# Altium PCB Zulu_a7_no_pmod.PcbDoc (part 3 of 5)
Units mm, origin at the board's own origin, x right, y up, seen from the top; angles counter-clockwise.
Board outline 60.96 x 25.4 mm, 6 copper layers (Top Layer, L2-GND, L3-SIG, L4-SIG, L5-VCC3V3, Bottom Layer), stack 1.65 mm thick; 169 components, 161 nets, 811 pads, 1742 vias.
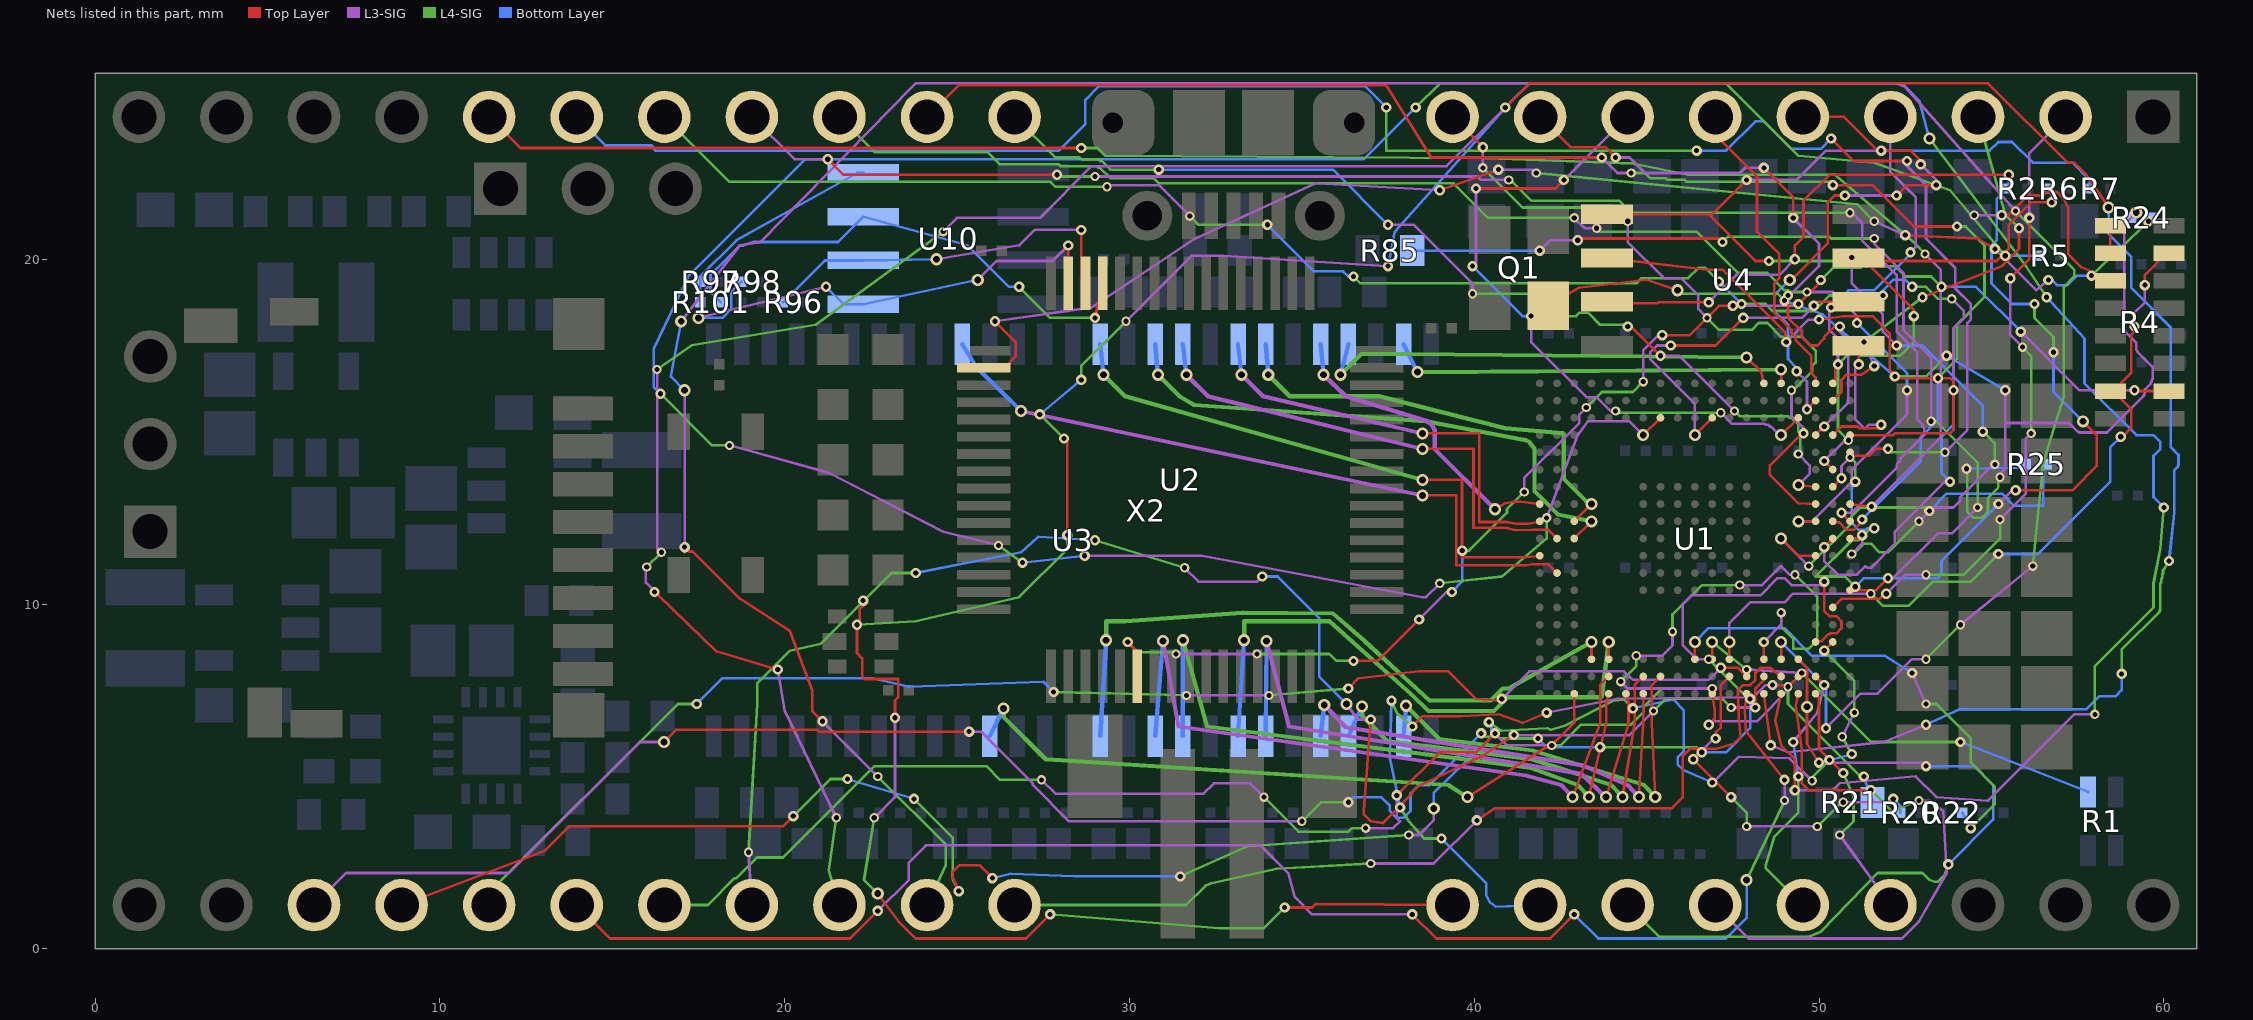
[diagram p6: the nets of this part, all layers, seen from the top]

## Via types
v1: diameter 0.35, hole 0.2, Top Layer to Bottom Layer, tented both sides, 373 vias
v2: diameter 0.27, hole 0.15, L3-SIG to L4-SIG, tented both sides, 363 vias
v3: diameter 0.3, hole 0.15, Top Layer to L2-GND, tented both sides, 289 vias
v4: diameter 0.3, hole 0.15, L2-GND to L3-SIG, tented both sides, 274 vias
v5: diameter 0.3, hole 0.15, L5-VCC3V3 to Bottom Layer, tented both sides, 222 vias
v6: diameter 0.3, hole 0.15, L4-SIG to L5-VCC3V3, tented both sides, 221 vias

## Nets (pads, with @x,y where several pads share a name; then routed paths per layer and width w, separated by ;. In a path a pad name is that pad's centre, name@x,y a point inside that pad or via, vN(x,y) a via of type N, cw(c..) or ccw(c..) an arc to the next point about the centre after c; other vN are vias at no path point) (continued)
BTN: R85.2 U1.N19 | length 27.5
  Top Layer w0.076: v3(43,20.55) 43.05,20.6 47.1,20.6 v3(47.2,20.5) ; U1.N19@50.9,10.4 51.65,10.4 v3(52,10.75)
  L3-SIG w0.076: v2(41.9,20.25) 42.2,20.55 v3(43,20.55) ; v2(51.6,20.6) 51.6,20.45 52.45,19.6 52.45,17.95 53.25,17.15 v2(53.25,15.3) ; v3(52,10.75) 52.15,10.75 53.45,12.05 53.85,12.05 v2(54.6,12.8)
  L4-SIG w0.076: v3(47.2,20.5) 47.35,20.65 50.3,20.65 50.35,20.6 v2(51.6,20.6) ; v2(53.25,15.3) 53.4,15.3 54.6,14.1 v2(54.6,12.8)
  Bottom Layer w0.076: R85.2@38.2,20.25 v2(41.9,20.25)
  other v2: 47.2,20.5
  other v4: 52,10.75 47.2,20.5 43,20.55
  other v5: 41.9,20.25
  other v6: 41.9,20.25
CAS#: U1.W3 U3.17 | length 19.9
  Top Layer w0.076: v1(39.8,4.4) 42.4,6.05 42.9,6.55 U1.W3@42.9,7.4
  L4-SIG w0.125: v1(26.35,6.975) 26.35,6.725 27.575,5.5 39.25,4.75 v1(39.8,4.4)
  Bottom Layer w0.125: U3.17@25.95,6.17 v1(26.35,6.975)
CFG-M0: R20.1 U1.V12 | length 10.5
  Top Layer w0.076: v3(46.35,5.5) v3(47.45,4.4) ; v3(47,6.1) 47,6.275 47.15,6.425 47.15,7.187 47.15,7.65 U1.V12@47.4,7.9
  L3-SIG w0.076: v3(46.35,5.5) 46.95,6.1 v3(47,6.1) ; v2(47.9,3.55) v2(49.95,3.55) ; v2(50.7,4.25) 52.05,4.25 v2(52.15,4.35)
  L4-SIG w0.076: v3(47.45,4.4) 47.9,3.95 v2(47.9,3.55) ; v2(49.95,3.55) 50.65,4.25 v2(50.7,4.25)
  Bottom Layer w0.076: v2(52.15,4.35) 52.35,4.15 R20.1@52.35,3.95
  other v2: 47.45,4.4
  other v4: 47.45,4.4 46.35,5.5 47,6.1
  other v5: 52.15,4.35
  other v6: 52.15,4.35
CFG-M1: R21.2 U1.W11 | length 8.2
  Top Layer w0.076: v3(46.8,6.5) 46.975,6.675 46.975,6.925 U1.W11@46.9,7.4
  L3-SIG w0.076: v3(46.8,6.5) 46.9,6.6 48.2,6.6 49.1,7.5 v2(49.1,7.6)
  L4-SIG w0.076: v2(49.1,7.6) 49.1,7.1 51.2,5 v6(51.3,5)
  Bottom Layer w0.076: v6(51.3,5) R21.2@51.55,4.25
  other v4: 46.8,6.5
  other v5: 51.3,5
CFG-M2: R22.2 U1.U10 | length 13.8
  Top Layer w0.076: U1.U10@46.4,8.4 v1(46.4,8.9)
  L3-SIG w0.076: v2(52.7,8) v2(53.1,7.1)
  L4-SIG w0.076: v2(53.1,7.1) 53.4,7.1 54.4,6.1 54.4,5.4 55.1,4.7 55.1,4.2 v6(54.4,3.5)
  Bottom Layer w0.076: v1(46.4,8.9) 46.8,9.3 49,9.3 49.8,8.5 51.9,8.5 v2(52.7,8) ; R22.2@54.15,3.95 v6(54.4,3.5)
  other v5: 54.4,3.5 52.7,8
  other v6: 52.7,8
CHAN0: U1.B18 X2.3 | length 12
  Top Layer w0.076: U1.B18@50.4,15.9 50.65,16.15 50.65,16.5 50.8,16.65 51.225,16.65 v3(51.6,16.9) ; v3(53,18.9) 55.3,19.8 55.8,20.3 v3(55.8,20.9)
  L3-SIG w0.076: v2(51.3,17.6) v3(51.6,16.9)
  L4-SIG w0.076: v2(51.3,17.6) v3(53,18.9) ; X2.3@54.61,24.13 55.4,21.3 v3(55.8,20.9)
  other v2: 53,18.9 55.8,20.9
  other v4: 51.6,16.9 53,18.9 55.8,20.9
CHAN1: U1.A18 X2.4 | length 9.7
  Top Layer w0.076: U1.A18@50.4,16.4 50.475,16.475 50.475,16.875 v3(50.55,16.95)
  L3-SIG w0.076: v2(50.35,18.6) 50.3,18.55 50.3,17.95 50.55,17.7 v3(50.55,16.95) ; X2.4@52.07,24.13 52.07,22.53 52.8,21.8 52.8,20.35 v2(52.65,20.2)
  Bottom Layer w0.076: v2(50.35,18.6) 50.85,19.1 51.6,19.1 52.65,20.15 v2(52.65,20.2)
  other v4: 50.55,16.95
  other v5: 50.35,18.6 52.65,20.2
  other v6: 50.35,18.6 52.65,20.2
CHAN2: U1.B17 X2.5 | length 15.6
  Top Layer w0.076: v1(49.15,19.4) 49.2,19.4 50.25,20.45 50.25,21.65 50.45,21.85 v3(50.75,21.85) ; X2.5@49.53,24.13 50.72,24.13 51.7,23.15 52.65,23.15 52.95,22.85 v3(52.95,22.75) ; v3(49.65,15.65) U1.B17@49.9,15.9 ; v3(52.25,21.85) 52.55,22.15 v3(53.4,22.15)
  L3-SIG w0.076: v2(49.35,16.75) 49.65,16.45 v3(49.65,15.65) ; v3(50.75,21.85) v3(52.25,21.85) ; v3(52.95,22.75) 53.4,22.3 v3(53.4,22.15)
  Bottom Layer w0.076: v1(49.15,19.4) 48.7,18.95 48.7,18.5 49.1,18.1 49.1,17.1 49.35,16.85 v2(49.35,16.75)
  other v4: 49.65,15.65 50.75,21.85 52.25,21.85 53.4,22.15 52.95,22.75
  other v5: 49.35,16.75
  other v6: 49.35,16.75
CHAN3: U1.A17 X2.6 | length 9.1
  Top Layer w0.076: X2.6@46.99,24.13 46.99,23.61 48.2,22.4 48.2,20.8 48.85,20.15 48.85,19.45 48.7,19.3 48.7,18.45 49.2,17.95 49.2,17.85 49.325,17.725 49.325,17.65 49.775,17.2 49.775,16.7 49.9,16.575 U1.A17@49.9,16.4
CHAN4: U1.C16 X2.7 | length 19.7
  Top Layer w0.076: v3(40.05,22.05) 42.35,22.05 v3(42.6,22.3) ; v1(48.9,14.9) U1.C16@49.4,15.4
  L3-SIG w0.076: v2(39.95,19.8) 40.05,19.9 v3(40.05,22.05) ; v2(41.65,18.35) 41.65,17.6 43.25,16 43.55,16 43.95,15.6 v2(44.1,15.6) ; v3(42.6,22.3) 44.43,24.13 X2.7@44.45,24.13 ; v2(47.15,15.55) 47.475,15.225 48.425,15.225 48.45,15.2 48.525,15.2 48.575,15.15 48.6,15.15 48.85,14.9 v1(48.9,14.9)
  L4-SIG w0.076: v2(44.1,15.6) 44.15,15.55 v2(47.15,15.55)
  Bottom Layer w0.076: v2(39.95,19.8) 41.4,18.35 v2(41.65,18.35)
  other v4: 40.05,22.05 42.6,22.3
  other v5: 41.65,18.35 39.95,19.8
  other v6: 41.65,18.35 39.95,19.8
CHAN5: U1.D17 X2.8 | length 18.5
  Top Layer w0.076: X2.8@41.91,24.13 42.79,23.25 43.8,23.25 v3(44.1,22.95) ; v3(48.4,22.65) 49.25,21.8 v3(49.25,21.2) ; v3(49.1,18.95) 49.1,18.3 49.5,17.9 49.5,17.75 49.75,17.5 49.95,17.5 50.15,17.7 50.15,17.75 50.45,18.05 v3(50.6,18.05) ; U1.D17@49.9,14.9 v3(50.15,15.15)
  L3-SIG w0.076: v3(44.1,22.95) 44.5,22.95 44.95,22.5 47.7,22.5 47.85,22.65 v3(48.4,22.65) ; v3(49.1,18.95) 49.15,18.95 50,19.8 50,20.45 v3(49.25,21.2) ; v3(50.15,15.15) 50.85,15.85 50.85,17.65 50.6,17.9 v3(50.6,18.05)
  other v4: 50.15,15.15 50.6,18.05 49.1,18.95 49.25,21.2 48.4,22.65 44.1,22.95
CHAN6: U1.H17 X2.9 | length 20.6
  Top Layer w0.076: X2.9@39.37,24.13 v3(40.25,23.25) ; v3(49.55,14.95) 49.5,14.95 48.575,14.025 48.575,13.745 49.4,12.92 U1.H17@49.9,12.9
  L3-SIG w0.076: v2(40.25,22.65) v3(40.25,23.25) ; v2(44.45,21.1) 44.45,20.5 45.5,19.45 46,19.45 46.5,18.95 46.5,18.55 v2(46.75,18.3) ; v2(49.2,16.2) 49.2,15.45 49.55,15.1 v3(49.55,14.95)
  L4-SIG w0.076: v2(40.25,22.65) 41.4,21.5 44.05,21.5 v2(44.45,21.1) ; v2(46.75,18.3) 47.1,17.95 48.05,17.95 48.25,18.15 48.5,18.15 48.9,17.75 49.5,17.75 49.9,17.35 49.9,17 49.8,16.9 49.8,16.75 49.25,16.2 v2(49.2,16.2)
  other v4: 49.55,14.95 40.25,23.25
CHAN7: U1.G17 X2.10 | length 29.3
  Top Layer w0.076: v3(44.45,18.05) 44.55,18.05 v3(45.4,17.2) ; v1(49.4,13.45) U1.G17@49.9,13.4
  L3-SIG w0.076: v2(37.5,21) 38.25,21 39.95,19.3 v2(39.95,19) ; v3(45.4,17.2) 45.95,17.2 v2(47.55,15.6) ; v1(49.4,13.45) 49.725,13.775 49.725,14.025 v2(49.4,14.35)
  L4-SIG w0.076: X2.10@26.67,24.13 27.85,22.95 28.55,22.95 28.6,22.9 29.1,22.9 29.15,22.85 29.2,22.85 29.45,22.6 v6(30.85,22.6) ; v2(39.95,19) 41.95,19 42.6,18.35 42.95,18.35 43.05,18.45 43.3,18.45 43.65,18.1 44.4,18.1 v3(44.45,18.05) ; v2(47.55,15.6) 47.7,15.45 49.1,15.45 49.15,15.4 49.2,15.4 49.4,15.2 49.4,15 49.45,14.95 49.45,14.4 v2(49.4,14.35)
  Bottom Layer w0.076: v6(30.85,22.6) 35.9,22.6 v2(37.5,21)
  other v2: 44.45,18.05
  other v4: 45.4,17.2 44.45,18.05
  other v5: 37.5,21 30.85,22.6
  other v6: 37.5,21
CHAN8: U1.J18 X2.11 | length 43.8
  Top Layer w0.076: X2.11@24.13,24.13 25.05,25.05 36.65,25.05 37.45,25.05 38.75,22.95 v3(43.7,22.95) ; U1.J18@50.4,12.4 50.425,12.375 50.575,12.375 50.8,12.15 51,12.15 51.25,12.4 v3(51.25,12.45) ; v3(50.4,22.15) 51.55,22.15 52.75,20.95 v3(54,20.95)
  L3-SIG w0.076: v3(43.7,22.95) 44.15,22.5 v2(44.55,22.5)
  L4-SIG w0.076: v2(44.55,22.5) 44.95,22.5 45.1,22.35 45.55,22.35 45.6,22.3 46.1,22.3 46.15,22.25 50.3,22.25 v3(50.4,22.15) ; v6(53.45,16.55) 54,17.1 54,18.1 54.8,18.9 54.8,20.4 54.25,20.95 v3(54,20.95)
  Bottom Layer w0.076: v3(51.25,12.45) 52.95,14.15 52.95,14.85 53.45,15.35 v6(53.45,16.55)
  other v2: 51.25,12.45 54,20.95 50.4,22.15
  other v4: 51.25,12.45 54,20.95 50.4,22.15 43.7,22.95
  other v5: 51.25,12.45 53.45,16.55
  other v6: 51.25,12.45
CHAN9: U1.J17 X2.12 | length 40.5
  Top Layer w0.076: v1(49.4,12.4) U1.J17@49.9,12.4
  L3-SIG w0.076: v2(42.9,21.2) 43.2,20.9 v2(43.55,20.9) ; v1(49.4,12.4) 49.8,12.4 50.95,13.55 50.95,13.9 52.55,15.5 v2(52.55,16.2) ; v2(49.65,19.05) 50.4,19.05 51.1,18.35 v2(51.1,18.15)
  L4-SIG w0.076: X2.12@21.59,24.13 22.62,23.1 25.9,23.1 26.25,22.75 27.95,22.75 28,22.7 29.05,22.7 29.1,22.65 29.15,22.65 29.45,22.35 30.7,22.35 30.85,22.2 39.4,22.2 40.4,21.2 v2(42.9,21.2) ; v2(43.55,20.9) 43.65,20.8 46.45,20.8 47.65,19.6 48.5,19.6 49,19.1 49.1,19.1 49.15,19.05 v2(49.65,19.05)
  Bottom Layer w0.076: v2(51.1,18.15) 52.55,16.7 v2(52.55,16.2)
  other v5: 52.55,16.2 51.1,18.15
  other v6: 52.55,16.2 51.1,18.15
CHAN10: U1.J19 X2.13 | length 44.1
  Top Layer w0.076: v3(21.25,22.9) 21.7,22.45 v3(27.9,22.45) ; v3(50.65,12.65) U1.J19@50.9,12.4
  L3-SIG w0.076: X2.13@19.05,24.13 20.28,22.9 v3(21.25,22.9) ; v2(29,22.4) 40.1,22.4 40.2,22.3 v2(41,22.3) ; v3(50.65,12.65) 50.95,12.65 52.25,13.95 52.25,14.05 52.35,14.15 52.35,14.2 53.05,14.9 53.05,15.1 53,15.15 53,15.2 52.85,15.35 52.85,17.3 52.25,17.9 52.25,19.55 51.25,20.55 51.25,21.05 50.95,21.35 v2(50.9,21.35)
  L4-SIG w0.076: v3(27.9,22.45) 27.95,22.4 v2(29,22.4) ; v2(41,22.3) 41.05,22.3 41.65,21.7 44.2,21.7 44.55,21.35 v2(50.9,21.35)
  other v2: 27.9,22.45
  other v4: 50.65,12.65 27.9,22.45 21.25,22.9
CHAN11: U1.K18 X2.14 | length 52.5
  Top Layer w0.076: v3(50.15,11.65) U1.K18@50.4,11.9
  L3-SIG w0.076: v2(29.35,22.1) 29.4,22.15 30.85,22.15 v2(31.75,21.25) ; v3(50.15,11.65) 50.15,11.25 50.55,10.85 51.1,10.85 51.35,11.1 51.4,11.05 51.5,11.05 52.2,11.75 52.2,12.1 53.65,13.55 v2(53.8,13.55) ; v2(53.85,18.85) 54.2,18.5 54.2,18.3 53.9,18 v2(53.9,16.2)
  L4-SIG w0.076: X2.14@16.51,24.13 18.39,22.25 27.7,22.25 27.85,22.1 v2(29.35,22.1) ; v2(31.75,21.25) 32,21 v6(34,21) ; v6(36.5,19.5) 36.7,19.3 44.7,19.3 44.85,19.45 46.2,19.45 46.5,19.75 46.7,19.75 v6(47.1,19.35) ; v6(47.75,18.7) 48.45,18.7 48.65,18.5 49.85,18.5 50.3,18.95 v6(51.85,18.95) ; v6(52.7,19.2) 53.1,19.2 53.45,18.85 v2(53.85,18.85)
  Bottom Layer w0.076: v6(34,21) 35.35,19.65 36.2,19.65 36.35,19.5 v6(36.5,19.5) ; v6(47.1,19.35) v6(47.75,18.7) ; v6(51.85,18.95) 51.85,19.1 52.15,19.4 52.5,19.4 v6(52.7,19.2) ; v2(53.8,13.55) 53.55,13.8 53.55,14.85 53.9,15.2 v2(53.9,16.2)
  other v4: 50.15,11.65
  other v5: 53.8,13.55 53.9,16.2 47.75,18.7 51.85,18.95 52.7,19.2 47.1,19.35 36.5,19.5 34,21
  other v6: 53.8,13.55 53.9,16.2
CHAN12: U1.E19 X2.15 | length 55.2
  Top Layer w0.076: v3(50.35,23.5) 51,22.85 v3(52.55,22.85) ; U1.E19@50.9,14.4 51,14.3 51.45,14.3 51.65,14.5 v3(52,14.5)
  L3-SIG w0.076: v3(52.55,22.85) 52.55,22.7 53.1,22.15 53.1,20.6 53.95,19.75 53.95,19.15 54.4,18.7 54.4,18.25 54.3,18.15 54.3,15.05 v2(53.65,14.4)
  L4-SIG w0.076: v6(37.45,24.4) 37.45,23.15 v6(46.45,23.15) ; v3(52,14.5) 52.1,14.4 v2(53.65,14.4)
  Bottom Layer w0.076: X2.15@13.97,24.13 14.8,23.3 16.15,23.3 16.25,23.15 27.95,23.15 28.72,23.92 28.72,24.62 29.12,25.02 36.83,25.02 v6(37.45,24.4) ; v6(46.45,23.15) 47.3,23.15 48.15,24 48.4,24 49.2,23.2 50.05,23.2 v3(50.35,23.5)
  other v2: 52,14.5 50.35,23.5
  other v4: 52,14.5 52.55,22.85 50.35,23.5
  other v5: 46.45,23.15 50.35,23.5 37.45,24.4
  other v6: 50.35,23.5
CHAN13: U1.H19 X2.16 | length 52
  Top Layer w0.076: X2.16@11.43,24.13 12.335,23.225 v3(28.6,23.225) ; U1.H19@50.9,12.9 v3(51.525,12.825)
  L3-SIG w0.076: v3(51.525,12.825) 53.525,14.825 53.525,19.7 v2(53.075,20.15)
  L4-SIG w0.076: v3(28.6,23.225) 29.075,23.225 29.3,23 40.325,22.925 44.625,22.775 46.2,22.45 50.475,22.45 50.525,22.4 52.8,20.45 v2(53.075,20.15)
  other v2: 28.6,23.225
  other v4: 51.525,12.825 28.6,23.225
CHAN14: U1.W17 X2.24 | length 7.2
  Top Layer w0.076: U1.W17@49.9,7.4 50,7.3 50,5.8 v3(50.7,5.1)
  L3-SIG w0.076: v2(50.6,3.3) X2.24@52.07,1.27
  L4-SIG w0.076: v2(50.6,3.3) 51,3.7 51,4.4 v3(50.7,5.1)
  other v2: 50.7,5.1
  other v4: 50.7,5.1
CHAN15: U1.V17 X2.25 | length 7.8
  Top Layer w0.076: U1.V17@49.9,7.9 v3(50.15,7.65)
  L3-SIG w0.076: v2(49.25,6) 49.95,6.85 v3(50.15,7.65)
  L4-SIG w0.076: v6(49.4,5) 49.4,3.95 48.7,3.25 48.45,2.425 48.45,2.35 X2.25@49.53,1.27
  Bottom Layer w0.076: v2(49.25,6) v6(49.4,5)
  other v4: 50.15,7.65
  other v5: 49.4,5 49.25,6
  other v6: 49.25,6
CHAN16: U1.W16 X2.26 | length 17.1
  Top Layer w0.076: U1.W16@49.4,7.4 49.325,7.05 49.5,5.8 49.5,4.8 49.7,4.6 v3(51.5,4.6)
  L3-SIG w0.076: X2.26@46.99,1.27 47.96,0.3 52.4,0.3 52.9,0.8 53.7,2.2 53.6,4 53.2,4.3 v2(52.9,4.3)
  L4-SIG w0.076: v3(51.5,4.6) 52.1,4 v2(52.9,4.3)
  other v2: 51.5,4.6
  other v4: 51.5,4.6
CHAN17: U1.U16 X2.27 | length 22.2
  Top Layer w0.076: U1.U16@49.4,8.4 49.65,8.15 v1(49.65,7.02) 49.65,5.95 v3(50,5.4)
  L3-SIG w0.076: v3(50,5.4) 53,5.4 v2(53.1,5.3)
  L4-SIG w0.076: X2.27@44.45,1.27 45.37,0.35 49.7,0.35 50.05,0.5 51.7,2.2 53,2.2 53.2,2 53.35,1.95 53.45,1.95 53.65,2.15 v6(53.75,2.45)
  Bottom Layer w0.076: v2(53.1,5.3) 54.5,5.3 55.05,4.75 55.05,3.75 v6(53.75,2.45)
  other v4: 50,5.4
  other v5: 53.75,2.45 53.1,5.3
  other v6: 53.1,5.3
CHAN18: U1.V16 X2.28 | length 21.4
  Top Layer w0.076: v3(38.2,6.45) 38.5,6.75 39.6,6.75 40.7,6.8 41.4,6.55 v3(42.1,6.85) ; v3(48.65,7.65) 49.15,7.65 U1.V16@49.4,7.9
  L3-SIG w0.076: v3(42.1,6.85) 44.15,7.25 48.1,7.3 48.45,7.65 v3(48.65,7.65)
  L4-SIG w0.076: v6(37.6,7.2) 37.75,6.85 v3(38.2,6.45) ; v6(37.85,4.1) 38.1,3.7 38.55,3.2 v6(39.05,3.2)
  Bottom Layer w0.076: v6(37.6,7.2) 37.55,5.55 v6(37.85,4.1) ; v6(39.05,3.2) 40.35,1.9 40.35,1.55 40.45,1.35 40.625,1.225 X2.28@41.91,1.27
  other v2: 38.2,6.45
  other v4: 38.2,6.45 42.1,6.85 48.65,7.65
  other v5: 39.05,3.2 37.85,4.1 37.6,7.2
CHAN19: U1.W15 X2.29 | length 104.1
  Top Layer w0.076: v3(22.275,10.1) 22.275,9.95 22.175,9.85 22.175,9.475 v3(22.1,9.4) 22.1,8.65 22.1,8.575 22.25,8.425 22.25,7.9 22.325,7.825 23.3,7.825 23.3,7.3 23.2,7.2 v3(23.2,6.7) ; v1(22.7,1.6) 23.3,0.8 23.8,0.3 27,0.3 v3(27.7,1) ; v3(28.1,14.8) 28.2,14.7 v3(28.2,12) ; v3(34.5,1.2) 35.3,1.2 35.4,1.3 X2.29@39.37,1.27 ; U1.W15@48.9,7.4 48.725,6.625 48.9,5.9 49.3,5.5 v3(49.3,4.6)
  L3-SIG w0.076: v2(22.6,3.8) 23.2,4.4 v3(23.2,6.7) ; v2(29.9,18.2) 31.8,20.1 32.7,20.1 v2(37.5,19.8) ; v3(49.3,4.6) 50.4,4.6 50.6,4.8 52.8,5 53.4,4.4 54.9,4.3 57.4,6.8 v2(58,6.8)
  L4-SIG w0.076: v3(22.1,9.4) 23.8,9.5 26.8,10.2 28.2,11.6 v3(28.2,12) ; v2(22.6,3.8) 22.3,2 v1(22.7,1.6) ; v6(27.4,15.5) v3(28.1,14.8) ; v3(27.7,1) 32.6,0.6 33.9,0.6 v3(34.5,1.2) ; v6(28.6,16.5) 28.6,16.9 v2(29.9,18.2) ; v1(53.2,23.5) 56,19.8 v6(56.6,18.9) ; v2(58,6.8) 58,8.2 59.7,9.9 59.7,10.6 59.9,11.6 v6(60,12.8)
  Bottom Layer w0.076: v6(27.4,15.5) v6(28.6,16.5) ; v2(37.5,19.8) 37.7,20.8 41.1,24.6 41.6,25.1 52.4,25.1 52.9,24.6 v1(53.2,23.5) ; v6(56.6,18.9) 57.7,17.7 57.7,16.4 59.2,14.9 59.7,14.9 59.9,14.7 59.9,14.5 59.7,14.3 59.7,13.1 v6(60,12.8)
  other v2: 27.7,1 34.5,1.2 22.1,9.4 28.2,12 28.1,14.8
  other v4: 27.7,1 34.5,1.2 49.3,4.6 23.2,6.7 22.1,9.4 28.2,12 28.1,14.8
  other v5: 60,12.8 27.4,15.5 28.6,16.5 56.6,18.9 37.5,19.8
  other v6: 37.5,19.8
CHAN20: U1.V15 X2.30 | length 26.6
  Top Layer w0.076: v3(40.075,3.725) 40.6,4.075 45.725,4.075 46.05,4.4 46.05,5.6 46.25,5.8 47.025,5.8 47.525,5.95 47.725,6.125 47.675,6.7 47.65,7.475 47.65,7.5 47.8,7.65 48,7.65 48.15,7.8 48.15,8 48.3,8.15 48.575,8.15 U1.V15@48.9,7.9
  L3-SIG w0.076: v2(37,2.475) 38.825,2.475 v3(40.075,3.725)
  L4-SIG w0.076: X2.30@26.67,1.27 31.645,1.27 32.2,1.825 32.375,1.9 34.275,2.325 v2(37,2.475)
  other v4: 40.075,3.725
CHAN21: U1.U15 X2.31 | length 86.6
  Top Layer w0.076: v3(17.1,11.65) 17.225,11.525 17.325,11.525 18.675,10.175 20.15,9.225 20.8,7.5 20.8,6.9 v3(21.1,6.6) ; U1.U15@48.9,8.4 v1(48.9,8.9)
  L3-SIG w0.076: v1(17,18.2) 18.7,20.4 19.3,20.5 23.7,25 23.8,25.1 52.2,25.1 52.5,25 v2(55.7,21.4) ; 17.1,11.5 v1(17.1,16.2) ; v3(21.1,6.6) v2(22.7,5) ; v2(50.2,6.4) 51.2,7.4 51.7,7.4 52.7,8.4 v2(53.1,8.4) ; v2(54.1,9.4) v2(56.2,11.1)
  L4-SIG w0.076: v2(22.7,5) 24.675,3.025 24.675,2.425 X2.31@24.13,1.27 ; v2(53.1,8.4) v2(54.1,9.4) ; v2(55.7,21.4) 57.4,19.7 57.4,19.5 57.1,19.2 57.1,16 56.5,14.1 v2(56.2,11.1)
  Bottom Layer w0.076: v1(17,18.2) 16.7,16.6 v1(17.1,16.2) ; v1(48.9,8.9) 50.2,7.6 v2(50.2,6.4)
  other v4: 21.1,6.6 17.1,11.65
  other v5: 50.2,6.4
  other v6: 50.2,6.4
CHAN22: U1.W14 X2.32 | length 92.8
  Top Layer w0.076: v3(16.225,10.35) 16.625,9.975 16.775,9.825 18.025,8.625 v3(19.8,8.1) ; v3(40.9,24.4) 41.6,25.1 54.9,25.1 57.2,22.8 57.4,22.8 57.75,22.45 v1(58.4,21.5) ; U1.W14@48.4,7.4 v3(48.6,5.9)
  L3-SIG w0.076: v2(16,11.075) 15.975,10.925 15.975,10.625 16.225,10.375 v3(16.225,10.35) ; v2(16.3,16.8) 16.3,11.6 16.45,11.45 v2@16.475,11.475 ; v2@16.425,11.475 v2(16.425,11.5) ; v3(19.8,8.1) 20,6.9 v2(21.5,3.8) ; v2(24.6,20.8) 25,21.2 27.4,21.2 28.9,22.7 39.2,22.7 v3(40.9,24.4) ; v3(48.6,5.9) 49.1,5.7 51.9,6 v2(53.1,6.5)
  L4-SIG w0.076: v2(16,11.075) v2(16.425,11.5) ; v2(16.3,16.8) 17.3,17.5 20.9,18.1 v2(24.6,20.8) ; v2(21.5,3.8) 21.275,2.275 X2.32@21.59,1.27 ; v6(58.775,7.975) 58.775,8.675 59.875,9.775 59.875,9.8 59.9,9.825 59.9,10.6 59.925,10.625 59.925,10.725 59.95,10.75 59.95,10.85 59.975,10.875 59.975,10.975 60,11 v6(60.15,11.25)
  Bottom Layer w0.076: v2(53.1,6.5) 54.075,6.95 57.75,6.95 58.125,7.325 58.6,7.325 58.775,7.5 v6(58.775,7.975) ; v1(58.4,21.5) 58.4,20.725 59.05,20.075 59.05,19.175 60.2,18.025 60.2,14.55 60.425,14.325 60.425,14.025 60.4,14 60.4,13.975 60.3,13.875 60.3,12.65 v6(60.15,11.25)
  other v4: 48.6,5.9 19.8,8.1 16.225,10.35 40.9,24.4
  other v5: 53.1,6.5 58.775,7.975 60.15,11.25
  other v6: 53.1,6.5
CHAN23: U1.V14 X2.33 | length 45.4
  Top Layer w0.076: v3(37,6.65) 36.8,4 36.8,3.9 37,3.7 37.35,3.65 38.2,4.5 38.2,4.55 38.35,4.7 40.25,5.6 v3(41.15,6.2) ; v3(48.15,7) 48.15,7.55 48.4,7.8 U1.V14@48.4,7.9
  L3-SIG w0.076: v2(18.95,2.8) X2.33@19.05,1.27 ; v2(31.6,11.05) 32,10.65 33.7,10.65 v2(33.85,10.8) ; v1(36.3,7.1) 36.55,6.75 36.65,6.65 v3(37,6.65) ; v3(41.15,6.2) 44.5,6.2 v2(45.2,6.9) ; v2(47.45,7) v3(48.15,7)
  L4-SIG w0.076: v2(18.95,2.8) 19.2,7.1 19.2,7.7 20.15,8.65 21.05,8.85 23.1,10.9 v6(23.8,10.9) ; v6(29,11.85) v2(31.6,11.05) ; v2(45.2,6.9) 45.55,7.25 47.2,7.25 v2(47.45,7)
  Bottom Layer w0.076: v6(23.8,10.9) 26.85,11.5 27.35,11.95 v6(29,11.85) ; v2(33.85,10.8) 34.3,10.8 35.5,9.6 35.5,7.9 v1(36.3,7.1)
  other v4: 41.15,6.2 37,6.65 48.15,7
  other v5: 33.85,10.8 23.8,10.9 29,11.85
  other v6: 33.85,10.8
CHAN24: U1.U14 X2.34 | length 51.5
  Top Layer w0.076: v3(37.75,4.45) 39,5.7 40.05,5.7 v3(40.6,6.25) ; U1.U14@48.4,8.4 v3(48.4,8.9)
  L3-SIG w0.076: v2(27.45,4.9) 27.85,4.5 32.15,4.5 32.45,4.8 33.5,4.8 v2(33.9,4.4) ; v2(36.85,3.5) 37.65,3.5 37.85,3.7 37.75,3.8 v3(37.75,4.45) ; v3(40.6,6.25) 40.95,5.9 v2(42.25,5.9) ; v2(44.25,7.75) 44.45,7.55 v2(46.9,7.55) ; v2(44.7,8.5) 45.45,8.5 45.75,8.8 v2(45.75,9.2) ; v2(47.7,10.55) 48.35,10.55 48.9,11.1 49.15,10.85 v2(49.3,10.85) ; v3(48.4,8.9) 48.9,9.4 v2(48.9,9.75)
  L4-SIG w0.076: X2.34@16.51,1.27 17.77,1.27 18.55,2.05 18.6,2.05 19.2,2.65 19.95,2.65 22.6,5.3 25.85,5.3 26.25,4.9 v2(27.45,4.9) ; v2(33.9,4.4) 34.9,3.4 36.35,3.4 36.45,3.5 v2(36.85,3.5) ; v2(42.25,5.9) 42.5,5.9 43.1,6.5 44.55,6.5 44.9,6.85 44.9,7 45.45,7.55 v2(46.9,7.55) ; v2(44.25,7.75) 44.7,8.2 v2(44.7,8.5) ; v2(45.75,9.2) 45.75,9.7 46.6,10.55 v2(47.7,10.55) ; v2(48.9,9.75) 48.9,9.35 49.25,9 49.25,8.7 49.7,8.7 49.95,8.95 49.95,10.2 v2(49.3,10.85)
  other v4: 37.75,4.45 40.6,6.25 48.4,8.9
CHAN25: U1.W13 X2.35 | length 45.1
  Top Layer w0.076: X2.35@13.97,1.27 14.94,0.3 21.9,0.3 v3(22.7,1.1) ; v3(38.2,1) 38.9,0.3 42.2,0.3 v3(42.9,1) ; U1.W13@47.9,7.4 47.85,6.975 47.875,6.325 v3(49,4.9)
  L3-SIG w0.076: v3(22.7,1.1) 23.6,2 23.6,2.5 24.1,3 33.8,3 34.6,2.2 34.8,1.5 35.3,1 v3(38.2,1) ; v2(49,4.3) v3(49,4.9)
  L4-SIG w0.076: v1(47.9,2) v2(49,4.3)
  Bottom Layer w0.076: v3(42.9,1) 43.6,0.3 47.3,0.3 47.9,0.9 v1(47.9,2)
  other v2: 42.9,1
  other v4: 38.2,1 42.9,1 22.7,1.1 49,4.9
  other v5: 42.9,1
  other v6: 42.9,1
CHAN26: U1.V13 X2.36 | length 40.7
  Top Layer w0.076: v3(36.35,7.55) 36.65,7.85 38.4,8.05 39.25,8.05 40.05,7.25 40.75,7.2 v3(40.8,7.25) ; v3(47.15,8.15) 47.65,8.15 U1.V13@47.9,7.9
  L3-SIG w0.076: v2(31.65,7.35) v2(34.05,7.35) ; v3(40.8,7.25) 41.6,8.05 44.35,8.05 44.6,7.8 46.8,7.8 v3(47.15,8.15)
  L4-SIG w0.076: X2.36@11.43,1.27 11.43,1.63 16.9,7.1 v6(17.45,7.1) ; v6(27.8,7.45) v2(31.65,7.35) ; v2(34.05,7.35) v3(36.35,7.55)
  Bottom Layer w0.076: v6(17.45,7.1) 18.2,7.85 22.55,7.85 23.6,7.6 27.5,7.75 v6(27.8,7.45)
  other v2: 36.35,7.55
  other v4: 40.8,7.25 36.35,7.55 47.15,8.15
  other v5: 17.45,7.1 27.8,7.45
CHAN27: U1.T18 X2.37 | length 55.8
  Top Layer w0.076: X2.37@8.89,1.27 13.05,2.85 13.75,3.55 19.95,3.55 v3(20.25,3.85) ; v3(25.05,1.675) 24.875,2.075 24.875,2.225 25.075,2.425 25.65,2.425 v3(26.025,2.05) ; v3(50.15,8.65) U1.T18@50.4,8.9
  L3-SIG w0.076: v2(38.1,3.3) 38.4,3.3 38.825,3.725 v1(38.825,4.075) ; v2(46.9,4.825) 46.925,4.825 47.675,5.575 49.15,5.525 v2(49.8,4.875) ; v2(50.675,6.15) v2(51.025,6.85)
  L4-SIG w0.076: v3(20.25,3.85) 21.325,4.925 v6(21.825,4.925) ; v6(23.75,4.35) 24.875,3.225 24.875,2 v3(25.05,1.675) ; v6(31.475,2.1) 33.425,2.975 v2(38.1,3.3) ; v6(40.425,6.575) 40.775,6.325 42.125,6.4 42.225,6.35 42.625,6.475 44.025,7.2 44.35,7.225 v6(44.6,6.975) ; v2(49.8,4.875) 49.8,4.975 v6(50.3,5.475) ; v3(50.15,8.65) 51.025,7.775 v2(51.025,6.85) ; v2(50.675,6.15) v6(50.95,5.65)
  Bottom Layer w0.076: v6(21.825,4.925) v6(23.75,4.35) ; v3(26.025,2.05) 26.55,2.175 28.4,2.1 v6(31.475,2.1) ; v1(38.825,4.075) 38.825,4.525 38.95,4.65 40.5,6.15 40.5,6.5 v6(40.425,6.575) ; v6(44.6,6.975) 45.6,7.2 45.775,7.225 46.075,6.925 46.075,5.725 45.9,5.55 45.9,5.35 46.05,5.2 v2(46.9,4.825) ; v6(50.3,5.475) v6(50.95,5.65)
  other v2: 25.05,1.675 26.025,2.05 20.25,3.85 50.15,8.65
  other v4: 25.05,1.675 26.025,2.05 20.25,3.85 50.15,8.65
  other v5: 26.025,2.05 31.475,2.1 23.75,4.35 46.9,4.825 21.825,4.925 50.3,5.475 50.95,5.65 40.425,6.575 44.6,6.975
  other v6: 26.025,2.05 46.9,4.825
CHAN28: U1.T17 X2.38 | length 59.1
  Top Layer w0.076: v1(16.5,6) 16.85,6.35 20.95,6.35 21,6.3 v3(25.35,6.3) ; U1.T17@49.9,8.9 49.925,8.925 50.075,8.925 50.275,9.125 50.3,9.125 50.325,9.15 50.5,9.15 50.65,9.3 50.65,9.5 50.5,9.65 50.3,9.65 50.15,9.8 v3(50.15,10.65)
  L3-SIG w0.076: X2.38@6.35,1.27 7.28,2.2 12,2.2 15.8,6 v1(16.5,6) ; v3(25.35,6.3) 25.7,6.3 27.2,4.8 27.2,4.75 28.25,3.7 v2(35,3.7) ; v2(46.8,8.4) 46.45,8.4 46.05,8.8 46.05,10 46.3,10.25 48.3,10.25 48.8,10.75 49,10.75 49.2,10.55 50.05,10.55 v3(50.15,10.65)
  L4-SIG w0.076: v2(35,3.7) 35.55,4.25 v6(36.35,4.25) ; v6(40.2,6.25) 40.3,6.15 40.7,6.15 40.75,6.1 v6(41.85,6.1) ; v6(43.65,5.85) 46.45,5.85 v6(46.6,5.7) ; v2(46.8,8.4) 47.95,7.25 v6(48,7.25)
  Bottom Layer w0.076: v6(36.35,4.25) 36.5,4.4 37.3,4.4 37.55,4.15 37.55,4 37.75,3.8 37.95,3.8 38.15,4 38.15,4.5 38.4,4.75 38.7,4.75 v6(40.2,6.25) ; v6(41.85,6.1) 42.1,5.85 v6(43.65,5.85) ; v6(46.6,5.7) 47.3,5.7 48,6.4 v6(48,7.25)
  other v4: 25.35,6.3 50.15,10.65
  other v5: 36.35,4.25 46.6,5.7 43.65,5.85 41.85,6.1 40.2,6.25 48,7.25
CHAN-CLK: U1.P18 X2.2 | length 19.2
  Top Layer w0.076: U1.P18@50.4,9.9 50.65,10.15 51.75,10.15 51.9,10.3 v3(51.95,10.3) ; v3(55.55,19.45) 56.1,20 v3(56.1,21.2)
  L3-SIG w0.076: v3(51.95,10.3) 52.5,10.85 v2(53.1,10.85) ; v2(55.25,12.45) 56,13.2 56,14.8 v2(56.15,14.95) ; v3(55.55,19.45) 55.55,17.8 v2(55.9,17.45) ; v3(56.1,21.2) 56.1,23.08 X2.2@57.15,24.13
  L4-SIG w0.076: v2(53.1,10.85) 54.2,10.85 55.25,11.9 v2(55.25,12.45) ; v2(55.9,17.45) 56.15,17.2 v2(56.15,14.95)
  other v4: 51.95,10.3 55.55,19.45 56.1,21.2
CKE: U1.M2 U3.37 | length 20.5
  Top Layer w0.076: v1(38.5,13.15) 39.479,13.15 39.479,11.13 40.9,11.13 41.5,11.13 41.688,11.15 42.15,11.15 U1.M2@42.4,10.9
  L3-SIG w0.125: v1(26.85,15.6) v1(38.5,13.15)
  Bottom Layer w0.125: U3.37@25.15,17.53 25.575,16.85 v1(26.85,15.6)
CLK-12M-FPGA: R25.2 U1.L17 | length 11.5
  Top Layer w0.076: v1(48.9,11.9) 49.4,11.4 U1.L17@49.9,11.4
  L3-SIG w0.076: v1(48.9,11.9) v2(49.7,11.1)
  L4-SIG w0.076: v2(49.7,11.1) 50.95,12.35 50.95,12.55 51.2,12.8 53.1,12.8 v6(53.2,12.7)
  Bottom Layer w0.076: v6(53.2,12.7) 53.7,13.2 55.3,13.2 55.65,12.85 56.5,12.85 R25.2@56.5,13.95
  other v5: 53.2,12.7
CLK-12M-FT: R24.2 U2.2 | length 38.8
  Top Layer w0.076: U2.2@25.775,16.85 26.375,16.85 26.7,17.175 26.7,17.6 v3(26.1,18.2) ; v3(39,22) v3(40.7,22.6) ; v3(52.5,20.7) 54.6,20.6 v3(55.1,20.3)
  L3-SIG w0.076: v3(26.1,18.2) 28.9,18.6 31.9,20.6 35.4,22.2 v3(39,22) ; v3(40.7,22.6) 41.7,22.6 v2(41.8,22.5) ; v2(51.6,21.1) v3(52.5,20.7) ; v3(55.1,20.3) 56.3,19.1 v2(56.65,19.4)
  L4-SIG w0.076: v2(41.8,22.5) 51.1,21.6 v2(51.6,21.1) ; v6(57.9,19.525) v6(59.55,21.1)
  Bottom Layer w0.076: v2(56.65,19.4) 56.75,19.4 56.9,19.25 57.2,19.25 57.475,19.525 v6(57.9,19.525)
  other v4: 26.1,18.2 55.1,20.3 52.5,20.7 39,22 40.7,22.6
  other v5: 56.65,19.4 57.9,19.525 59.55,21.1
  other v6: 56.65,19.4
CLK-12M-SHARED: Q1.3 R24.1 R25.1 | length 32.9
  Top Layer w0.076: Q1.3@42.15,18.65 43.025,19.175 45,19.4 v1(45.9,19.1)
  L3-SIG w0.076: v2(55.25,13.675) 55.25,13.775 55.375,13.9 55.4,13.95 v2(55.4,16.2) ; 55.4,15.25 57.25,15.25 57.5,15 57.525,15 57.55,14.975 58.35,14.975 59.425,16.05 59.425,16.075 59.45,16.1 59.45,16.225 59.625,16.4 59.625,16.425 59.65,16.45 59.65,16.5 59.675,16.525 59.675,16.875 59.225,17.325 59.225,17.35 59.2,17.375 59.2,17.575 58.875,17.9 58.875,17.925 58.85,17.95 58.85,21 v1(59.2,21.35)
  L4-SIG w0.076: v1(45.9,19.1) 46,19 48.8,19 v6(49,18.8) ; v6(52.2,16.6) 53.1,16.6 v6(53.7,17.2) ; v6(54.275,13.925) 54.3,13.725 54.3,12.675 54.45,12.525 54.5,12.5 54.7,12.5 54.725,12.525 54.75,12.525 54.875,12.65 54.875,12.675 54.9,12.7 54.9,13.075 55.175,13.35 55.2,13.4 55.2,13.625 v2(55.25,13.675)
  Bottom Layer w0.076: v6(49,18.8) 50.1,18.4 v6(52.2,16.6) ; v6(53.7,17.2) v2(55.4,16.2) ; v6(54.275,13.925) R25.1@55.9,13.95 ; R24.1@59.05,21.2 59.1,21.25 v1(59.2,21.35)
  other v5: 54.275,13.925 55.4,16.2 52.2,16.6 53.7,17.2 49,18.8
  other v6: 55.4,16.2
D0: U1.V8 U3.2 | length 12.4
  Top Layer w0.076: v1(45.25,4.4) 45.15,6.55 45.15,7.187 45.15,7.65 U1.V8@45.4,7.9
  L4-SIG w0.125: v1(38.025,7.05) 39,6.075 41.7,5.75 44.925,4.75 v1(45.25,4.4)
  Bottom Layer w0.125: U3.2@37.95,6.17 v1(38.025,7.05)
D1: U1.V7 U3.4 | length 13
  Top Layer w0.076: v1(44.3,4.4) 44.65,6.55 44.65,7.187 44.65,7.65 U1.V7@44.9,7.9
  L4-SIG w0.125: v1(36.75,7.025) 36.75,6.75 37.475,6.025 41.675,5.5 43.975,4.75 v1(44.3,4.4)
  Bottom Layer w0.125: U3.4@36.35,6.17 v1(36.75,7.025)
D2: U1.W7 U3.5 | length 13.7
  Top Layer w0.076: v1(44.775,4.4) 44.9,6.55 U1.W7@44.9,7.4
  L3-SIG w0.125: v1(35.65,7.075) 36.275,6.425 43.125,5.325 44.45,4.75 v1(44.775,4.4)
  Bottom Layer w0.125: U3.5@35.55,6.17 v1(35.65,7.075)
D3: U1.W6 U3.7 | length 18
  Top Layer w0.076: v1(43.825,4.4) 44.475,6.55 44.475,7.15 U1.W6@44.4,7.4
  L3-SIG w0.125: v1(33.975,8.925) 34.625,6.45 43.1,5.075 v1(43.825,4.4)
  Bottom Layer w0.125: U3.7@33.95,6.17 v1(33.975,8.925)
D4: U1.U5 U3.8 | length 17
  Top Layer w0.076: U1.U5@43.9,8.4 v1(43.9,8.9)
  L4-SIG w0.125: v1(33.325,8.95) 33.325,9.5 33.875,9.5 35.8,9.5 38.175,7.375 38.675,6.9 40.575,6.9 40.975,7.3 43.675,7.3 43.7,7.325 v1(43.9,8.9)
  Bottom Layer w0.125: U3.8@33.15,6.17 v1(33.325,8.95)
D5: U1.W5 U3.10 | length 19.8
  Top Layer w0.076: v1(43.325,4.4) 43.825,6.55 43.825,7.15 U1.W5@43.9,7.4
  L4-SIG w0.125: v1(31.55,8.95) 32.25,6.45 41.65,5.25 43,4.75 v1(43.325,4.4)
  Bottom Layer w0.125: U3.10@31.55,6.17 v1(31.55,8.95)
D6: U1.V5 U3.11 | length 20.7
  Top Layer w0.076: v1(42.85,4.4) 43.65,6.55 43.65,7.187 43.65,7.65 U1.V5@43.9,7.9
  L3-SIG w0.125: v1(30.975,8.925) 31.425,6.45 41.5,5.025 42.525,4.75 v1(42.85,4.4)
  Bottom Layer w0.125: U3.11@30.75,6.17 v1(30.975,8.925)
D7: U1.U4 U3.13 | length 19.4
  Top Layer w0.076: U1.U4@43.4,8.4 v1(43.4,8.9)
  L4-SIG w0.125: v1(29.325,8.95) 29.325,9.5 29.875,9.5 33.3,9.75 35.9,9.725 36.825,8.925 38.7,7.2 40.475,7.2 40.825,7.55 41,7.55 v1(43.4,8.9)
  Bottom Layer w0.125: U3.13@29.15,6.17 v1(29.325,8.95)
D8: U1.L1 U3.42 | length 16.4
  Top Layer w0.076: v1(38.5,13.6) 39.646,13.6 39.646,11.36 40.9,11.36 41.5,11.36 U1.L1@41.9,11.4
  L4-SIG w0.125: v1(29.25,16.65) 29.875,16.025 v1(38.5,13.6)
  Bottom Layer w0.125: U3.42@29.15,17.53 v1(29.25,16.65)
D9: U1.K3 U3.44 | length 16.2
  Top Layer w0.076: U1.K3@42.9,11.9 v1(43.4,12.4)
  L4-SIG w0.125: v1(30.825,16.65) 31.45,16.025 31.875,15.775 38.6,15.3 41.5,14.75 41.6,14.7 41.75,14.5 41.75,13.275 42.425,12.6 v1(43.4,12.4)
  Bottom Layer w0.125: U3.44@30.75,17.53 v1(30.825,16.65)
D10: U1.K2 U3.45 | length 14.5
  Top Layer w0.076: v1(38.5,14.5) 39.979,14.5 39.979,12.21 40.9,12.21 40.95,12.205 41.2,12.14 41.688,12.15 42.15,12.15 U1.K2@42.4,11.9
  L3-SIG w0.125: v1(31.65,16.65) 32.275,16.025 v1(38.5,14.5)
  Bottom Layer w0.125: U3.45@31.55,17.53 v1(31.65,16.65)
D11: U1.J1 U3.47 | length 12.5
  Top Layer w0.076: v1(38.5,14.95) 40.145,14.95 40.145,12.38 40.95,12.38 41.2,12.33 41.6,12.33 U1.J1@41.9,12.4
  L3-SIG w0.125: v1(33.25,16.65) 33.875,16.025 v1(38.5,14.95)
  Bottom Layer w0.125: U3.47@33.15,17.53 v1(33.25,16.65)
D12: U1.J3 U3.48 | length 12.9
  Top Layer w0.076: U1.J3@42.9,12.4 v1(43.4,12.9)
  L4-SIG w0.125: v1(34.025,16.65) 34.65,16.025 37.25,16.025 40.9,15.1 42.575,14.95 42.6,14.925 42.6,13.625 43.225,13 v1(43.4,12.9)
  Bottom Layer w0.125: U3.48@33.95,17.53 v1(34.025,16.65)
D13: U1.H1 U3.50 | length 9
  Top Layer w0.076: v1(40.6,12.75) 40.9,12.92 41.15,12.97 41.35,12.97 U1.H1@41.9,12.9
  L3-SIG w0.125: v1(35.625,16.65) 36.275,16.025 38.65,15.3 38.8,15.15 38.85,15.05 38.85,14.5 v1(40.6,12.75)
  Bottom Layer w0.125: U3.50@35.55,17.53 v1(35.625,16.65)
D14: U1.A14 U3.51 | length 13.9
  Top Layer w0.076: v1(47.9,17.15) 48.325,16.725 U1.A14@48.4,16.4
  L4-SIG w0.125: v1(36.125,16.65) 36.725,17.25 38,17.25 v1(47.9,17.15)
  Bottom Layer w0.125: v1(36.125,16.65) U3.51@36.35,17.53
D15: U1.A15 U3.53 | length 11.8
  Top Layer w0.076: U1.A15@48.9,16.4 v1(48.9,16.8)
  L4-SIG w0.125: v1(38.35,16.725) v1(48.9,16.8)
  Bottom Layer w0.125: U3.53@37.95,17.53 v1(38.35,16.725)
DONE: R4.2 U2.22 | length 39.3
  Top Layer w0.076: v3(29.95,8.9) 30.225,8.625 U2.22@30.225,7.9 ; v3(36.5,8.35) 37.2,8.35 v3(38.4,9.55) ; v3(45.45,17.8) 46.25,17.8 47.1,18.65 v3(47.5,18.65) ; v3(49.4,18.7) 50.05,19.35 v3(50.05,19.4) ; v3(59.15,16.2) 59.172,16.178 R4.2@60.15,16.178
  L3-SIG w0.076: v2(31.35,8.55) v2(33.7,8.55) ; v3(38.4,9.55) 39.2,10.35 v2(39.35,10.35) ; v2(41.45,13.25) 41.45,13.65 43.05,15.25 43.05,15.5 v2(43.25,15.7) ; v2(44.9,16.45) 44.9,17.35 45.35,17.8 v3(45.45,17.8) ; v3(47.5,18.65) 49.35,18.65 v3(49.4,18.7) ; v2(55.85,17.9) 57.55,16.2 v3(59.15,16.2)
  L4-SIG w0.076: v3(29.95,8.9) 30.25,8.6 31.3,8.6 v2(31.35,8.55) ; v2(33.7,8.55) 35.8,8.55 36,8.35 v3(36.5,8.35) ; v6(39.65,11.55) 39.85,11.55 40.95,12.65 40.95,12.75 v2(41.45,13.25) ; v2(43.25,15.7) 43.7,16.15 44.6,16.15 v2(44.9,16.45) ; v3(50.05,19.4) 50.4,19.75 51.2,19.75 51.25,19.8 52.2,19.8 52.5,19.5 53.25,19.5 v6(53.55,19.2)
  Bottom Layer w0.076: v2(39.35,10.35) 39.65,10.65 v6(39.65,11.55) ; v6(53.55,19.2) 54.55,19.2 v2(55.85,17.9)
  other v2: 36.5,8.35 29.95,8.9 50.05,19.4
  other v4: 36.5,8.35 29.95,8.9 38.4,9.55 59.15,16.2 45.45,17.8 47.5,18.65 49.4,18.7 50.05,19.4
  other v5: 39.35,10.35 39.65,11.55 55.85,17.9 53.55,19.2
  other v6: 39.35,10.35 55.85,17.9
DONE-PU: R4.9 R4.10 | length 0.8
  Top Layer w0.076: R4.10@58.45,20.178 R4.9@58.45,20.978
EE-CLK: R96.1 U2.62 U10.2 | length 11
  Top Layer w0.076: v3(28.6,20.85) 28.6,19.425 U2.62@28.725,19.3
  L3-SIG w0.076: v1(24.4,20) 26.8,20.4 27.25,20.85 v3(28.6,20.85)
  Bottom Layer w0.076: R96.1@19.95,18.75 21.165,19.965 U10.2@22.285,19.965 v1(24.4,20)
  other v4: 28.6,20.85
EE-CS: R98.1 U2.63 U10.1 | length 14.6
  Top Layer w0.076: U2.63@28.225,19.3 v3(28.225,20.4)
  L3-SIG w0.076: v1(17.5,18.3) v2(21.2,19.2) ; v1(25.6,19.4) 26.15,19.95 27.775,19.95 v3(28.225,20.4)
  Bottom Layer w0.076: v1(17.5,18.3) 18.2,18.3 18.45,18.55 18.45,19.05 R98.1@18.75,19.35 ; v2(21.2,19.2) 21.705,18.695 U10.1@22.285,18.695 v1(25.6,19.4)
  other v4: 28.225,20.4
  other v5: 21.2,19.2
  other v6: 21.2,19.2
EE-DATA: R101.2 U2.61 U10.3 | length 14.8
  Top Layer w0.076: v3(29,18.3) U2.61@29.225,19.3
  L4-SIG w0.076: v6(26.8,19.2) 27.7,18.3 v3(29,18.3)
  Bottom Layer w0.076: R101.2@18.15,18.75 17.85,19.05 17.85,19.55 18.7,20.4 18.8,20.4 19.1,20.5 21.55,20.5 U10.3@22.285,21.235 25.3,20.4 26.5,19.2 v6(26.8,19.2)
  other v2: 29,18.3
  other v4: 29,18.3
  other v5: 26.8,19.2
EE-DATA-DO: R97.1 R101.1 U10.4 | length 6.4
  Bottom Layer w0.076: R101.1@17.55,18.75 R97.1@17.55,19.35 17.55,19.5 18.6,20.55 22.1,22.5 U10.4@22.285,22.505
FLASH-CS#: R7.1 U1.K19 U4.1 | length 35
  Top Layer w0.076: U4.1@43.85,21.305 46.795,21.305 ; v3(47.9,22.3) 46.905,21.305 46.795,21.305 ; v3(48.55,19.95) 48.15,19.95 46.795,21.305 ; U1.K19@50.9,11.9 51.15,11.9 v3(51.25,12)
  L3-SIG w0.076: v3(47.9,22.3) 49.35,22.3 50.2,23.15 v2(51.8,23.15) ; v2(50.95,11.45) 51.25,11.75 v3(51.25,12) ; v2(50.95,20.05) 50.95,19.3 51.85,18.4 51.85,17.9 v2(52.25,17.5) ; v2(52.9,12.4) 53.3,12.8 53.9,12.8 54.1,13 54.1,13.1 55.05,14.05 v2(55.1,14.05)
  L4-SIG w0.076: v3(48.55,19.95) 50.85,19.95 v2(50.95,20.05) ; v2(50.95,11.45) 51,11.45 51.3,11.75 51.5,11.75 51.75,11.5 52,11.5 v2(52.9,12.4) ; v6(54.75,15) 55.1,14.65 v2(55.1,14.05)
  Bottom Layer w0.076: v2(51.8,23.15) 54.95,23.15 55.2,23.4 55.6,23.4 56.2,22.8 57.35,22.8 57.85,22.3 R7.1@57.849,22.05 ; v2(52.25,17.5) 53,17.5 54.75,15.75 v6(54.75,15)
  other v2: 48.55,19.95
  other v4: 51.25,12 48.55,19.95 47.9,22.3
  other v5: 54.75,15 52.25,17.5 51.8,23.15
  other v6: 52.25,17.5 51.8,23.15
FLASH-D00: U1.D18 U4.5 | length 4.6
  Top Layer w0.076: U1.D18@50.4,14.9 50.65,15.15 51.112,15.15 51.163,15.1 51.35,15.1 51.7,15.1 v3(51.8,15.2) ; v3(51.15,16.95) U4.5@51.15,17.495
  L3-SIG w0.076: v3(51.15,16.95) 51.05,16.85 51.05,15.35 51.3,15.1 51.35,15.1 51.45,15.2 v3(51.8,15.2)
  other v4: 51.8,15.2 51.15,16.95
FLASH-D01: U1.D19 U4.2 | length 17.2
  Top Layer w0.076: U4.2@43.85,20.035 46.75,19.7 47.2,19.7 49,17.9 v3(49.05,17.6) ; v3(50,18.25) 50.7,18.35 51.55,18.35 52.05,17.85 52.05,16.8 52.3,16.55 53.8,16.55 53.9,16.45 53.9,15.05 53.8,14.95 52.2,14.95 52.15,14.9 U1.D19@50.9,14.9
  L3-SIG w0.076: v3(49.05,17.6) 49.7,18.25 v3(50,18.25)
  other v4: 49.05,17.6 50,18.25
FLASH-D02: R2.1 U1.G18 U4.3 | length 40.4
  Top Layer w0.076: U4.3@43.85,18.765 43.89,18.725 45.325,18.725 45.35,18.75 v3(46.8,18.75) ; v3(49.3,20) 49.3,20.4 49.55,20.65 49.55,21.7 50.3,22.45 v3(55.5,22.45) ; U1.G18@50.4,13.4 v3(50.65,13.65) ; v3(55.7,13.3) 57.35,13.3 58.05,14 58.05,14.9 v1(57.65,15.3)
  L3-SIG w0.076: v3(46.8,18.75) 47.6,19.55 48.85,19.55 v3(49.3,20) ; v3(50.65,13.65) 50.65,14 v2(50.9,14.25) ; v2(55.2,12.9) 55.6,13.3 v3(55.7,13.3)
  L4-SIG w0.076: v2(50.9,14.25) 51.05,14.1 v6(51.05,13.55) ; v6(51.05,10.5) 50.75,10.8 49.9,10.8 50.95,11.85 51.15,11.85 51.5,12.2 v6(51.6,12.2) ; v6(56.25,18.7) 56.25,18.3 56.8,17.75 v6(56.8,17.3)
  Bottom Layer w0.076: v6(51.05,10.5) 51.3,10.75 53.45,10.75 53.55,10.85 53.55,11.25 v2(55.2,12.9) ; v6(51.05,13.55) 50.95,13.45 50.95,12.35 51.15,12.15 51.35,12.15 51.4,12.2 v6(51.6,12.2) ; v3(55.5,22.45) 55.5,22.101 R2.1@55.449,22.05 55.15,21.751 55.15,20.55 55,20.4 55,19.3 55.6,18.7 v6(56.25,18.7) ; v6(56.8,17.3) 56.8,16.15 v1(57.65,15.3)
  other v2: 55.5,22.45
  other v4: 55.7,13.3 50.65,13.65 46.8,18.75 49.3,20 55.5,22.45
  other v5: 51.05,10.5 51.6,12.2 55.2,12.9 51.05,13.55 56.8,17.3 56.25,18.7 55.5,22.45
  other v6: 55.2,12.9 55.5,22.45
FLASH-D03: R6.1 U1.F18 U4.7 | length 16.5
  Top Layer w0.076: v3(50.15,14.15) U1.F18@50.4,13.9 ; v3(52.75,18.35) 52.75,18.525 51.24,20.035 U4.7@51.15,20.035 51.235,19.95 55.15,19.95 55.5,20.3 55.5,21 56.15,21.65 v3(56.75,21.65)
  L3-SIG w0.076: v3(50.15,14.15) 50.75,14.75 v2(50.85,14.75)
  L4-SIG w0.076: v2(50.85,14.75) 50.55,15.05 50.55,16.95 50.9,17.3 51.1,17.3 51.2,17.2 52.35,17.2 52.75,17.6 v3(52.75,18.35)
  Bottom Layer w0.076: R6.1@56.649,22.05 56.75,21.949 v3(56.75,21.65)
  other v2: 52.75,18.35 56.75,21.65
  other v4: 50.15,14.15 52.75,18.35 56.75,21.65
  other v5: 56.75,21.65
  other v6: 56.75,21.65
FPGA-CCLK: U1.C11 U4.6 | length 10.3
  Top Layer w0.076: v3(45.7,17.5) 47,17.5 v3(47.8,18.3) ; v1(46.4,14.9) U1.C11@46.9,15.4 ; v3(49.85,18.65) 49.965,18.765 U4.6@51.15,18.765
  L3-SIG w0.076: v3(45.7,17.5) 45.3,17.5 45.1,17.3 45.1,17.1 46.4,15.8 v1(46.4,14.9) ; v3(47.8,18.3) 49.5,18.3 v3(49.85,18.65)
  other v4: 45.7,17.5 47.8,18.3 49.85,18.65
FPGA-DONE: R4.7 R4.15 U1.U12 | length 22
  Top Layer w0.076: U1.U12@47.4,8.4 v1(47.4,8.9) ; R4.15@58.45,16.178 R4.15@58.522,16.178 ; v3(58.75,14.85) 58.8,14.85 59.05,15.1 59.05,15.65 R4.15@58.522,16.178 ; v3(59.15,18.05) 59.15,17.9 59.05,17.8 59.05,16.7 R4.15@58.522,16.178 ; v3(59.45,19.25) 59.45,19.55 60.078,20.178 R4.7@60.15,20.178
  L3-SIG w0.076: v1(47.4,8.9) 47.4,9.45 48,10.05 49,10.05 49.25,10.3 v2(51.5,10.3) ; v3(59.15,18.05) 59.15,18.45 59.45,18.75 v3(59.45,19.25)
  L4-SIG w0.076: v2(51.5,10.3) 51.85,9.95 52.6,9.95 53.3,10.65 54.4,10.65 v6(55.2,11.45)
  Bottom Layer w0.076: v6(55.2,11.45) 56.35,11.45 58.45,13.55 58.45,14.55 v3(58.75,14.85)
  other v2: 58.75,14.85
  other v4: 58.75,14.85 59.15,18.05 59.45,19.25
  other v5: 55.2,11.45 58.75,14.85
  other v6: 58.75,14.85
FPGA-INIT#: R1.1 U1.U11 | length 12.8
  Top Layer w0.076: U1.U11@46.9,8.4 v1(46.9,8.9)
  L3-SIG w0.076: v2(47.9,8.1) v2(49.5,8)
  L4-SIG w0.076: v1(46.9,8.9) v2(47.9,8.1) ; v2(49.5,8) 51.5,6 v6(54.1,6)
  Bottom Layer w0.076: v6(54.1,6) R1.1@57.8,4.55
  other v5: 54.1,6
FPGA-TCK: R4.11 R5.2 U1.C8 | length 86.7
  Top Layer w0.076: v1(44.9,14.9) U1.C8@45.4,15.4 ; v3(55.3,21.275) 55.475,21.275 56.025,21.825 56.05,21.825 56.075,21.85 56.5,21.85 56.6,21.95 56.9,21.95 57.1,21.75 57.225,21.5 57.225,20.15 57.6,19.775 R4.11@58.1,19.55
  L3-SIG w0.076: v2(18.4,14.6) 21.3,13.8 24.6,12.1 v2(26.2,11.7) ; v2(28.7,11.4) 32.1,11.4 38.5,10.2 38.6,10.2 v2(39,10.6) ; v2(42.1,12.5) 43,14.9 43.3,15.3 44.5,15.3 v1(44.9,14.9) ; v2(54.5,21.275) v3(55.3,21.275)
  L4-SIG w0.076: v6(16.4,16.1) 17.9,14.6 v2(18.4,14.6) ; v2(26.2,11.7) v6(26.9,11.2) ; v6(38.3,24.4) 39,25.1 47.3,25.1 49.4,23 51.6,22.8 53.8,22 v6(55.4,20.1) ; v2(39,10.6) 40.8,10.8 42.1,11.9 v2(42.1,12.5) ; v2@54.475,21.225 v2(54.5,21.275)
  Bottom Layer w0.076: v6(16.4,16.1) 16.2,16.3 16.2,17.4 17.2,19.5 20.6,22.9 36.8,22.9 v6(38.3,24.4) ; v6(26.9,11.2) v2(28.7,11.4) ; v6(55.4,20.1) R5.2@56.4,20.1
  other v4: 55.3,21.275
  other v5: 26.9,11.2 28.7,11.4 16.4,16.1 55.4,20.1 38.3,24.4
  other v6: 28.7,11.4